# Altium PCB PCB_555_2026-10-25.pcbdoc
Units mil, origin at the board's own origin, x right, y up, seen from the top; angles counter-clockwise.
Board outline 4190 x 3380 mil, 2 copper layers (Top Layer, Bottom Layer); 18 components, 25 nets, 54 pads, 12 vias.
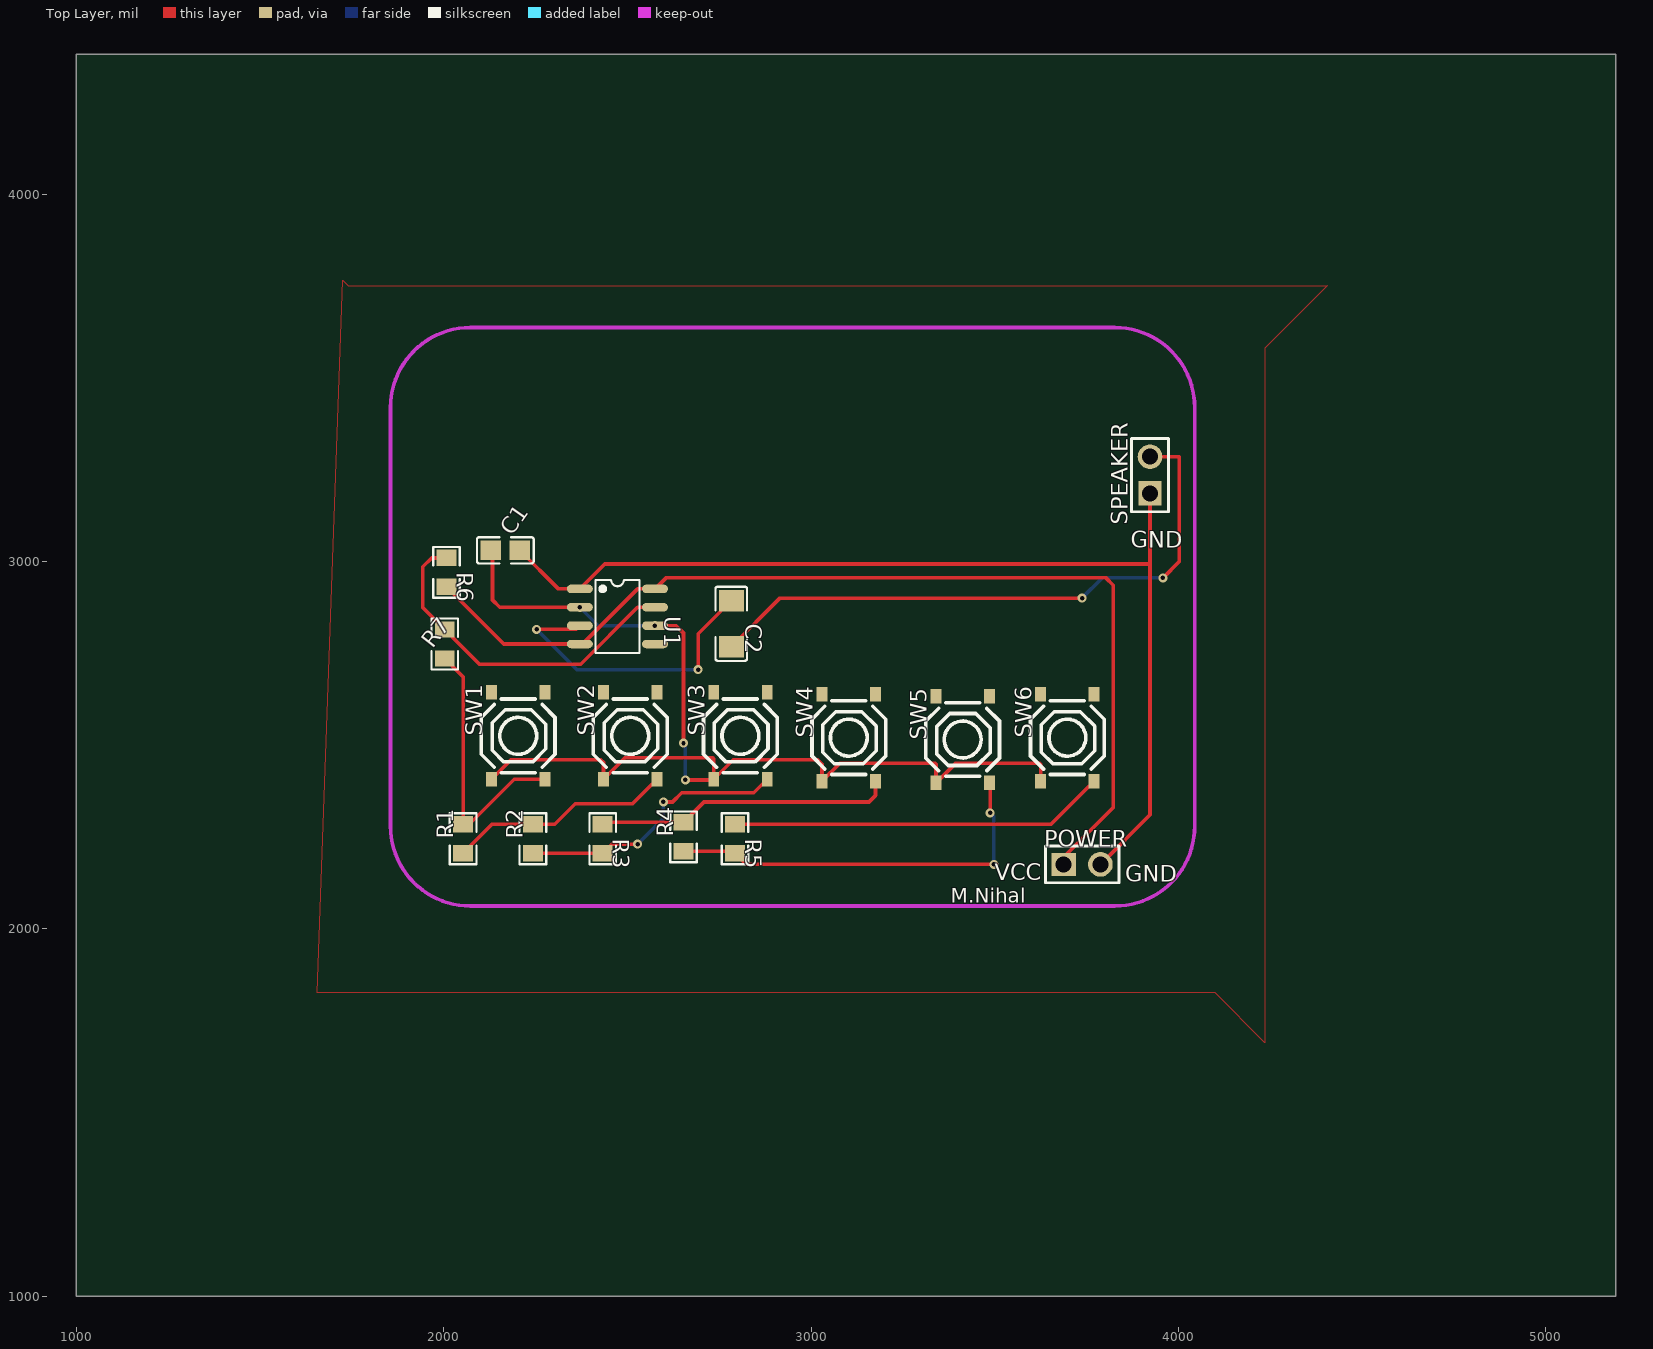
[diagram p0: Top Layer view]
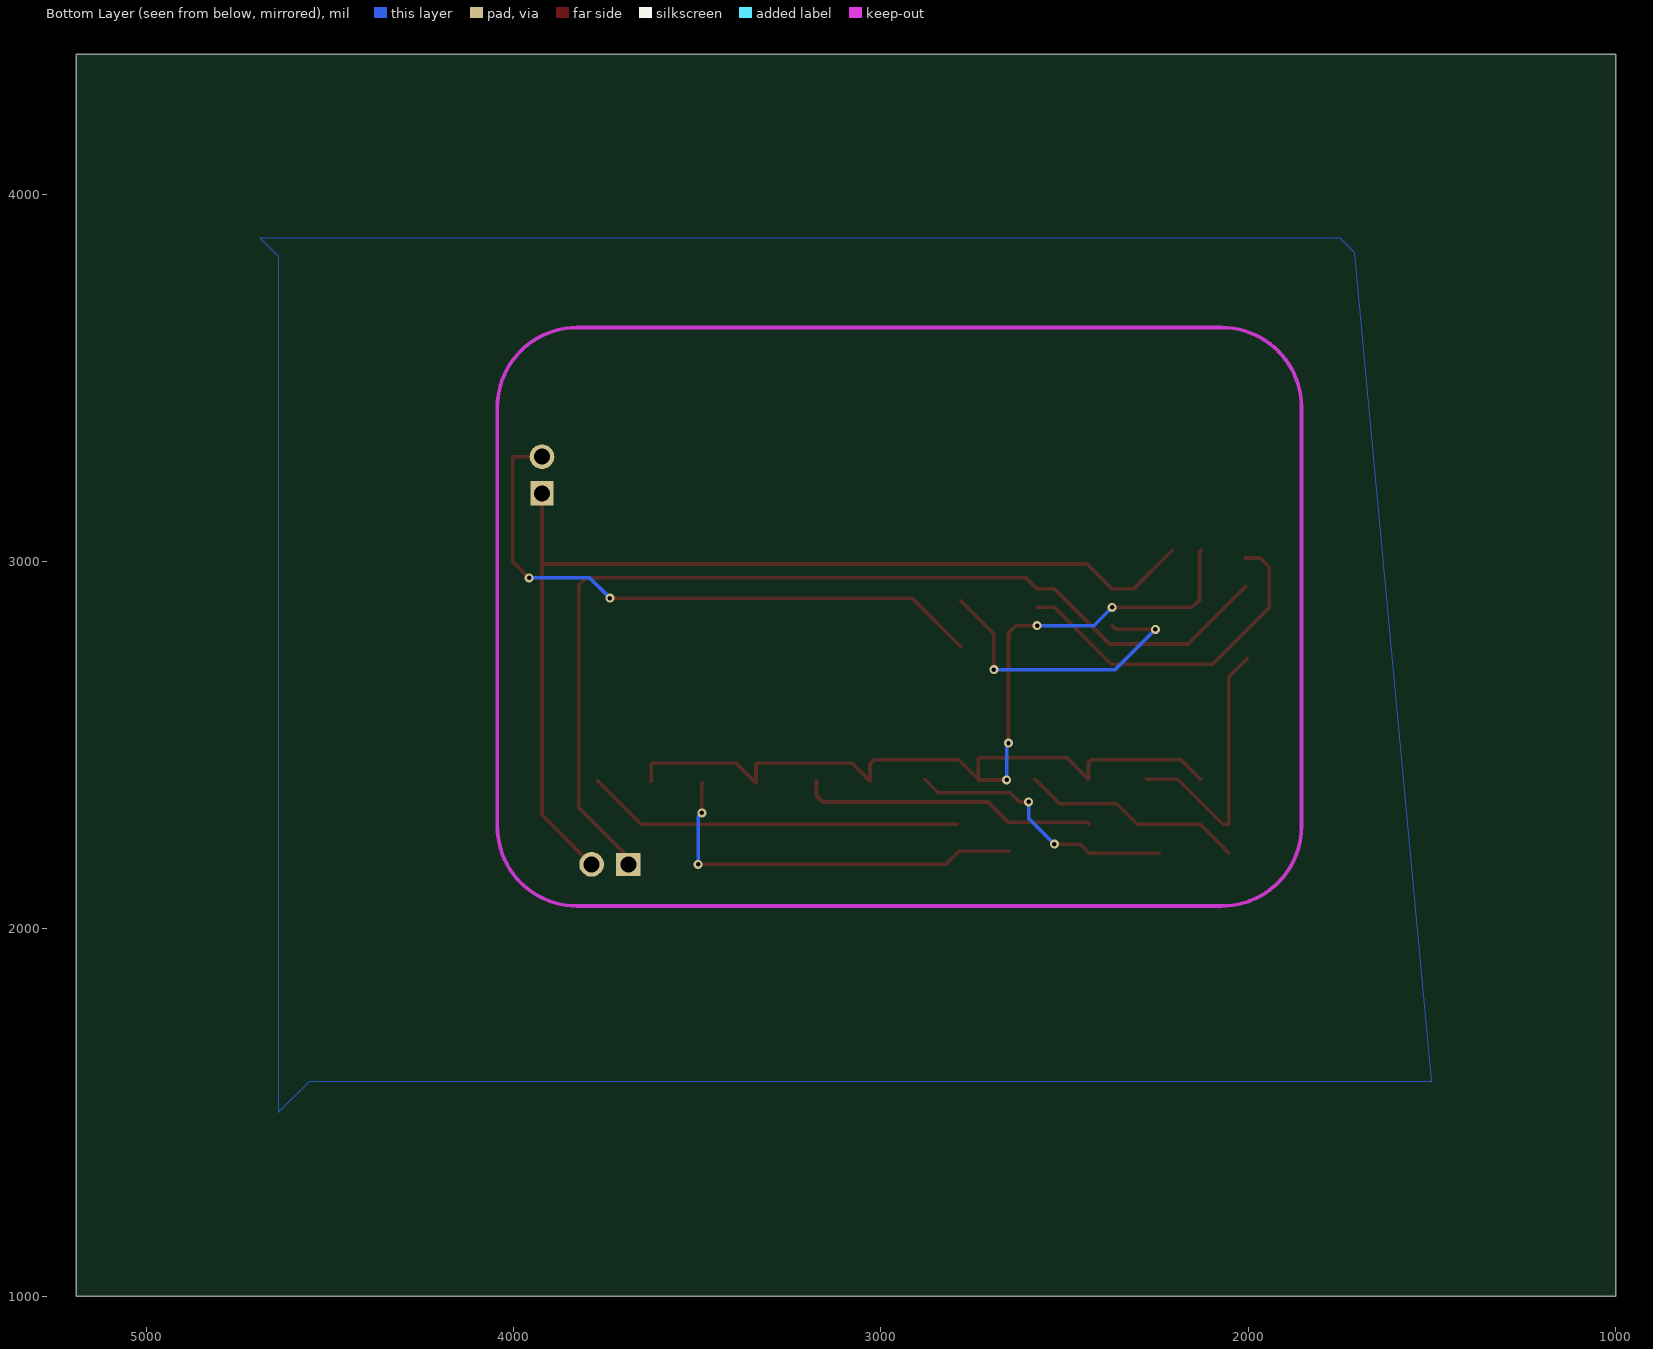
[diagram p1: Bottom Layer view, seen from below]

## Layer stack, top to bottom
Top Layer: signal copper (thickness not stored)
Dielectric: dielectric 12.6, FR-4, Dk 4.8
Bottom Layer: signal copper (thickness not stored)

## Board outline
5190,1000 1000,1000 1000,4380 5190,4380

## Components (designator, comment, footprint, x,y, rotation, side; value= is the part's Value field where it differs from the comment)
C1 "100nF" C0805 2167.64,3030 r0 top
C2 "10uF" C1206 2782.64,2830 r270 top
POWER "HDR-M-2.54_1x2" HDR-M-2.54_1X2 3737.64,2175 r0 top
R1 "1kΩ" R0805 2052.64,2245 r90 top
R2 "1kΩ" R0805 2242.64,2245 r90 top
R3 "1kΩ" R0805 2432.64,2245 r270 top
R4 "1kΩ" R0805 2652.64,2250 r90 top
R5 "1kΩ" R0805 2792.64,2245 r270 top
R6 "1kΩ" R0805 2007.64,2970 r270 top
R7 "4.7kΩ" R0805 2002.64,2775 r90 top
SPEAKER "HDR-M-2.54_1x2" HDR-M-2.54_1X2 3922.64,3235 r90 top
SW1 "TS-1187A-B-A-B" SW-SMD_4P-L5.1-W5.1-P3.70-LS6.5-TL_H1.5 2202.64,2525 r90 top
SW2 "TS-1187A-B-A-B" SW-SMD_4P-L5.1-W5.1-P3.70-LS6.5-TL_H1.5 2507.64,2525 r90 top
SW3 "TS-1187A-B-A-B" SW-SMD_4P-L5.1-W5.1-P3.70-LS6.5-TL_H1.5 2807.64,2525 r90 top
SW4 "TS-1187A-B-A-B" SW-SMD_4P-L5.1-W5.1-P3.70-LS6.5-TL_H1.5 3102.64,2520 r90 top
SW5 "TS-1187A-B-A-B" SW-SMD_4P-L5.1-W5.1-P3.70-LS6.5-TL_H1.5 3412.64,2515 r90 top
SW6 "TS-1187A-B-A-B" SW-SMD_4P-L5.1-W5.1-P3.70-LS6.5-TL_H1.5 3697.64,2520 r90 top
U1 "NE555_C5125085" SOIC-8_L4.9-W3.9-P1.27-LS6.0-BL 2472.64,2850 r270 top

## Footprints (in the part's own frame and the unit in brackets; to place one, negate y for a bottom-side part, rotate by r counter-clockwise, add the part's x,y. Pads: shape width x height; smd on the part's side, far side on the other; paste and mask are expansions set on the pad)
C0805 [mm]
  rect 1.41x1.35 smd paste-100 mask+0.051: 1(-1,0) 2(1,0)
  silkscreen extent -1.96,-0.9 1.96,0.9
C1206 [mm]
  rect 1.485x1.728 smd paste-100 mask+0.051: 1(-1.593,0) 2(1.593,0)
  silkscreen extent -2.56,-1.09 2.56,1.09
HDR-M-2.54_1X2 [mm]
  rect 1.7x1.575 hole 1.1 paste+0 mask+0.051: 1(-1.27,0)
  round 1.7 hole 1.1 paste+0 mask+0.051: 2(1.27,0)
  silkscreen extent -2.54,-1.27 2.54,1.27
R0805 [mil]
  rect 44.59x54.21 smd paste-3937.01 mask+2: 1(-39.37,0) 2(39.37,0)
  silkscreen extent -69,-36 69,36
SOIC-8_L4.9-W3.9-P1.27-LS6.0-BL [mm]
  oval 0.588x1.8 smd paste+0 mask+0.051: 1(-1.905,-2.6) 2(-0.635,-2.6) 3(0.635,-2.6) 4(1.905,-2.6) 5(1.905,2.6) 6(0.635,2.6) 7(-0.635,2.6) 8(-1.905,2.6)
  silkscreen extent -2.53,-1.52 2.53,1.52
SW-SMD_4P-L5.1-W5.1-P3.70-LS6.5-TL_H1.5 [mm]
  rect 1x0.75 smd paste+0 mask+0.051: 1(-3,1.85) 2(3,1.85) 3(-3,-1.85) 4(3,-1.85)
  silkscreen extent -2.55,-2.55 2.55,2.55

## Via types
v1: diameter 24.41, hole 12.2, Top Layer to Bottom Layer, tented both sides, 12 vias

## Nets (pads, with @x,y where several pads share a name; then routed paths per layer and width w, separated by ;. In a path a pad name is that pad's centre, name@x,y a point inside that pad or via, vN(x,y) a via of type N, cw(c..) or ccw(c..) an arc to the next point about the centre after c; other vN are vias at no path point)
C2_2: C2.2 SPEAKER.2 | length 1681.4
  Top Layer w10: C2.2 2915.34,2900 v1(3737.64,2900) ; SPEAKER.2 4002.64,3285 4002.64,3000 v1(3957.64,2955)
  Bottom Layer w10: v1(3737.64,2900) 3792.64,2955 v1(3957.64,2955)
DIS: R6.1 R7.2 U1.7 | length 946.2
  Top Layer w10: R6.1 1967.01,3009.37 1942.64,2985 1942.64,2874.37 R7.2 2097.01,2720 2372.64,2720 2527.64,2875 U1.7
GND: C1.2 POWER.2 SPEAKER.1 U1.1 | length 2853.2
  Top Layer w10: C1.2 2312.01,2925 U1.1 2438.3,2993.03 3922.64,2993.03 ; POWER.2 3922.64,2310 SPEAKER.1
R1_1: R1.1 R2.2 SW2.3 | length 611.2
  Top Layer w10: R1.1 2131.38,2284.37 R2.2 2302.01,2284.37 2357.64,2340 2513.58,2340 SW2.3
R1_2: R1.2 R7.1 SW1.3 | length 745.6
  Top Layer w10: R7.1 2052.64,2685.63 R1.2 ; R1.2 2069.4,2284.4 2191.9,2406.9 SW1.3
SW1_2: SW1.2
SW1_4: SW1.4
SW2_2: SW2.2
SW2_4: SW2.4
SW3_2: SW3.2
SW3_3: R2.1 R3.2 SW3.3 | length 747.6
  Top Layer w10: R2.1 R3.2 2457.01,2230 v1(2527.64,2230) ; v1(2597.64,2345) 2622.64,2345 2647.64,2370 2843.58,2370 SW3.3
  Bottom Layer w10: v1(2527.64,2230) 2597.64,2300 v1(2597.64,2345)
SW3_4: SW3.4
SW4_2: SW4.2
SW4_3: R3.1 R4.2 SW4.3 | length 814.4
  Top Layer w10: R3.1 2437.64,2289.37 R4.2 2708.27,2345 3157.64,2345 3175.47,2362.83 SW4.3
SW4_4: SW4.4
SW5_2: SW5.2
SW5_3: R4.1 R5.2 SW5.3 | length 1086.7
  Top Layer w10: R4.1 2787.64,2210.63 R5.2 2823.27,2175 v1(3497.64,2175) ; SW5.3 3487.64,2394.72 v1(3487.64,2315)
  Bottom Layer w10: v1(3487.64,2315) 3497.64,2305 v1(3497.64,2175)
SW5_4: SW5.4
SW6_2: SW6.2
SW6_3: R5.1 SW6.3 | length 1026.5
  Top Layer w10: R5.1 3652.95,2284.37 SW6.3
SW6_4: SW6.4
U1_2: C1.1 SW1.1 SW2.1 SW3.1 SW4.1 SW5.1 SW6.1 U1.2 U1.6 | length 3034.5
  Top Layer w10: C1.1 2132.64,3025.63 2132.64,2895 2152.64,2875 v1(2370.28,2875) ; SW1.1 2182.92,2460 2427.64,2460 2434.81,2452.83 SW2.1 2492.92,2465 2732.64,2465 2734.81,2462.83 SW3.1 ; v1(2575,2825) 2632.64,2825 2652.64,2805 v1(2652.64,2505) ; v1(2657.64,2405) 2732.92,2405 SW3.1 ; SW6.1 3624.81,2447.83 3622.64,2450 3392.92,2450 SW5.1 3339.81,2447.83 3337.64,2450 3077.92,2450 SW4.1 3029.81,2447.83 3017.64,2460 2787.92,2460 SW3.1
  Bottom Layer w10: v1(2370.28,2875) 2420.28,2825 v1(2575,2825) ; v1(2652.64,2505) 2657.64,2500 v1(2657.64,2405)
U1_3: C2.1 U1.3 | length 832.3
  Top Layer w10: v1(2252.64,2815) 2360.28,2815 U1.3 ; v1(2692.64,2705) 2692.64,2802.7 C2.1
  Bottom Layer w10: v1(2252.64,2815) 2362.64,2705 v1(2692.64,2705)
U1_5: U1.5
VOLT: POWER.1 R6.2 U1.4 U1.8 | length 2778.2
  Top Layer w10: R6.2 2163.27,2775 U1.4 2377.64,2775 2527.64,2925 U1.8 2605,2955 3802.64,2955 3822.64,2935 3822.64,2330 3687.64,2195 POWER.1

## Polygon pours and split planes (outlines as drawn)
GND on Bottom Layer (solid): 1710,3840 1750,3880 4690,3880 4640,3830 4640,1500 4555,1585 1500,1585
GND on Top Layer (solid): 1725,3765 1740,3750 4405,3750 4235,3580 4235,1690 4100,1825 1655,1825

## Keep-outs
Keep-Out Layer:
  lines w10: 1855.12,2278.77 ccw(c2072.28,2278.77) 2072.28,2061.61 ; 1855.12,3419.25 cw(c2072.28,3419.25) 2072.28,3636.41 ; 3826.96,2061.61 ccw(c3826.96,2278.77) 4044.13,2278.77 ; 3826.96,3636.41 cw(c3826.96,3419.25) 4044.13,3419.25

## Silkscreen, mask and mechanical layers (free items; w line width, h text height)
Top Overlay:
  text "GND" at 3870,3037.5 h45
  text "VCC" at 3500,2132.5 h45
  text "GND" at 3855,2127.5 h45
  text "M.Nihal" at 3380,2070.32 h39.37